# Altium PCB V3_Board.PcbDoc (part 7 of 7)
Units mil, origin at the board's own origin, x right, y up, seen from the top; angles counter-clockwise.
Board outline 6915 x 4422 mil, 2 copper layers (Top Layer, Bottom Layer), stack 57 mil thick; 364 components, 243 nets, 1048 pads, 599 vias.
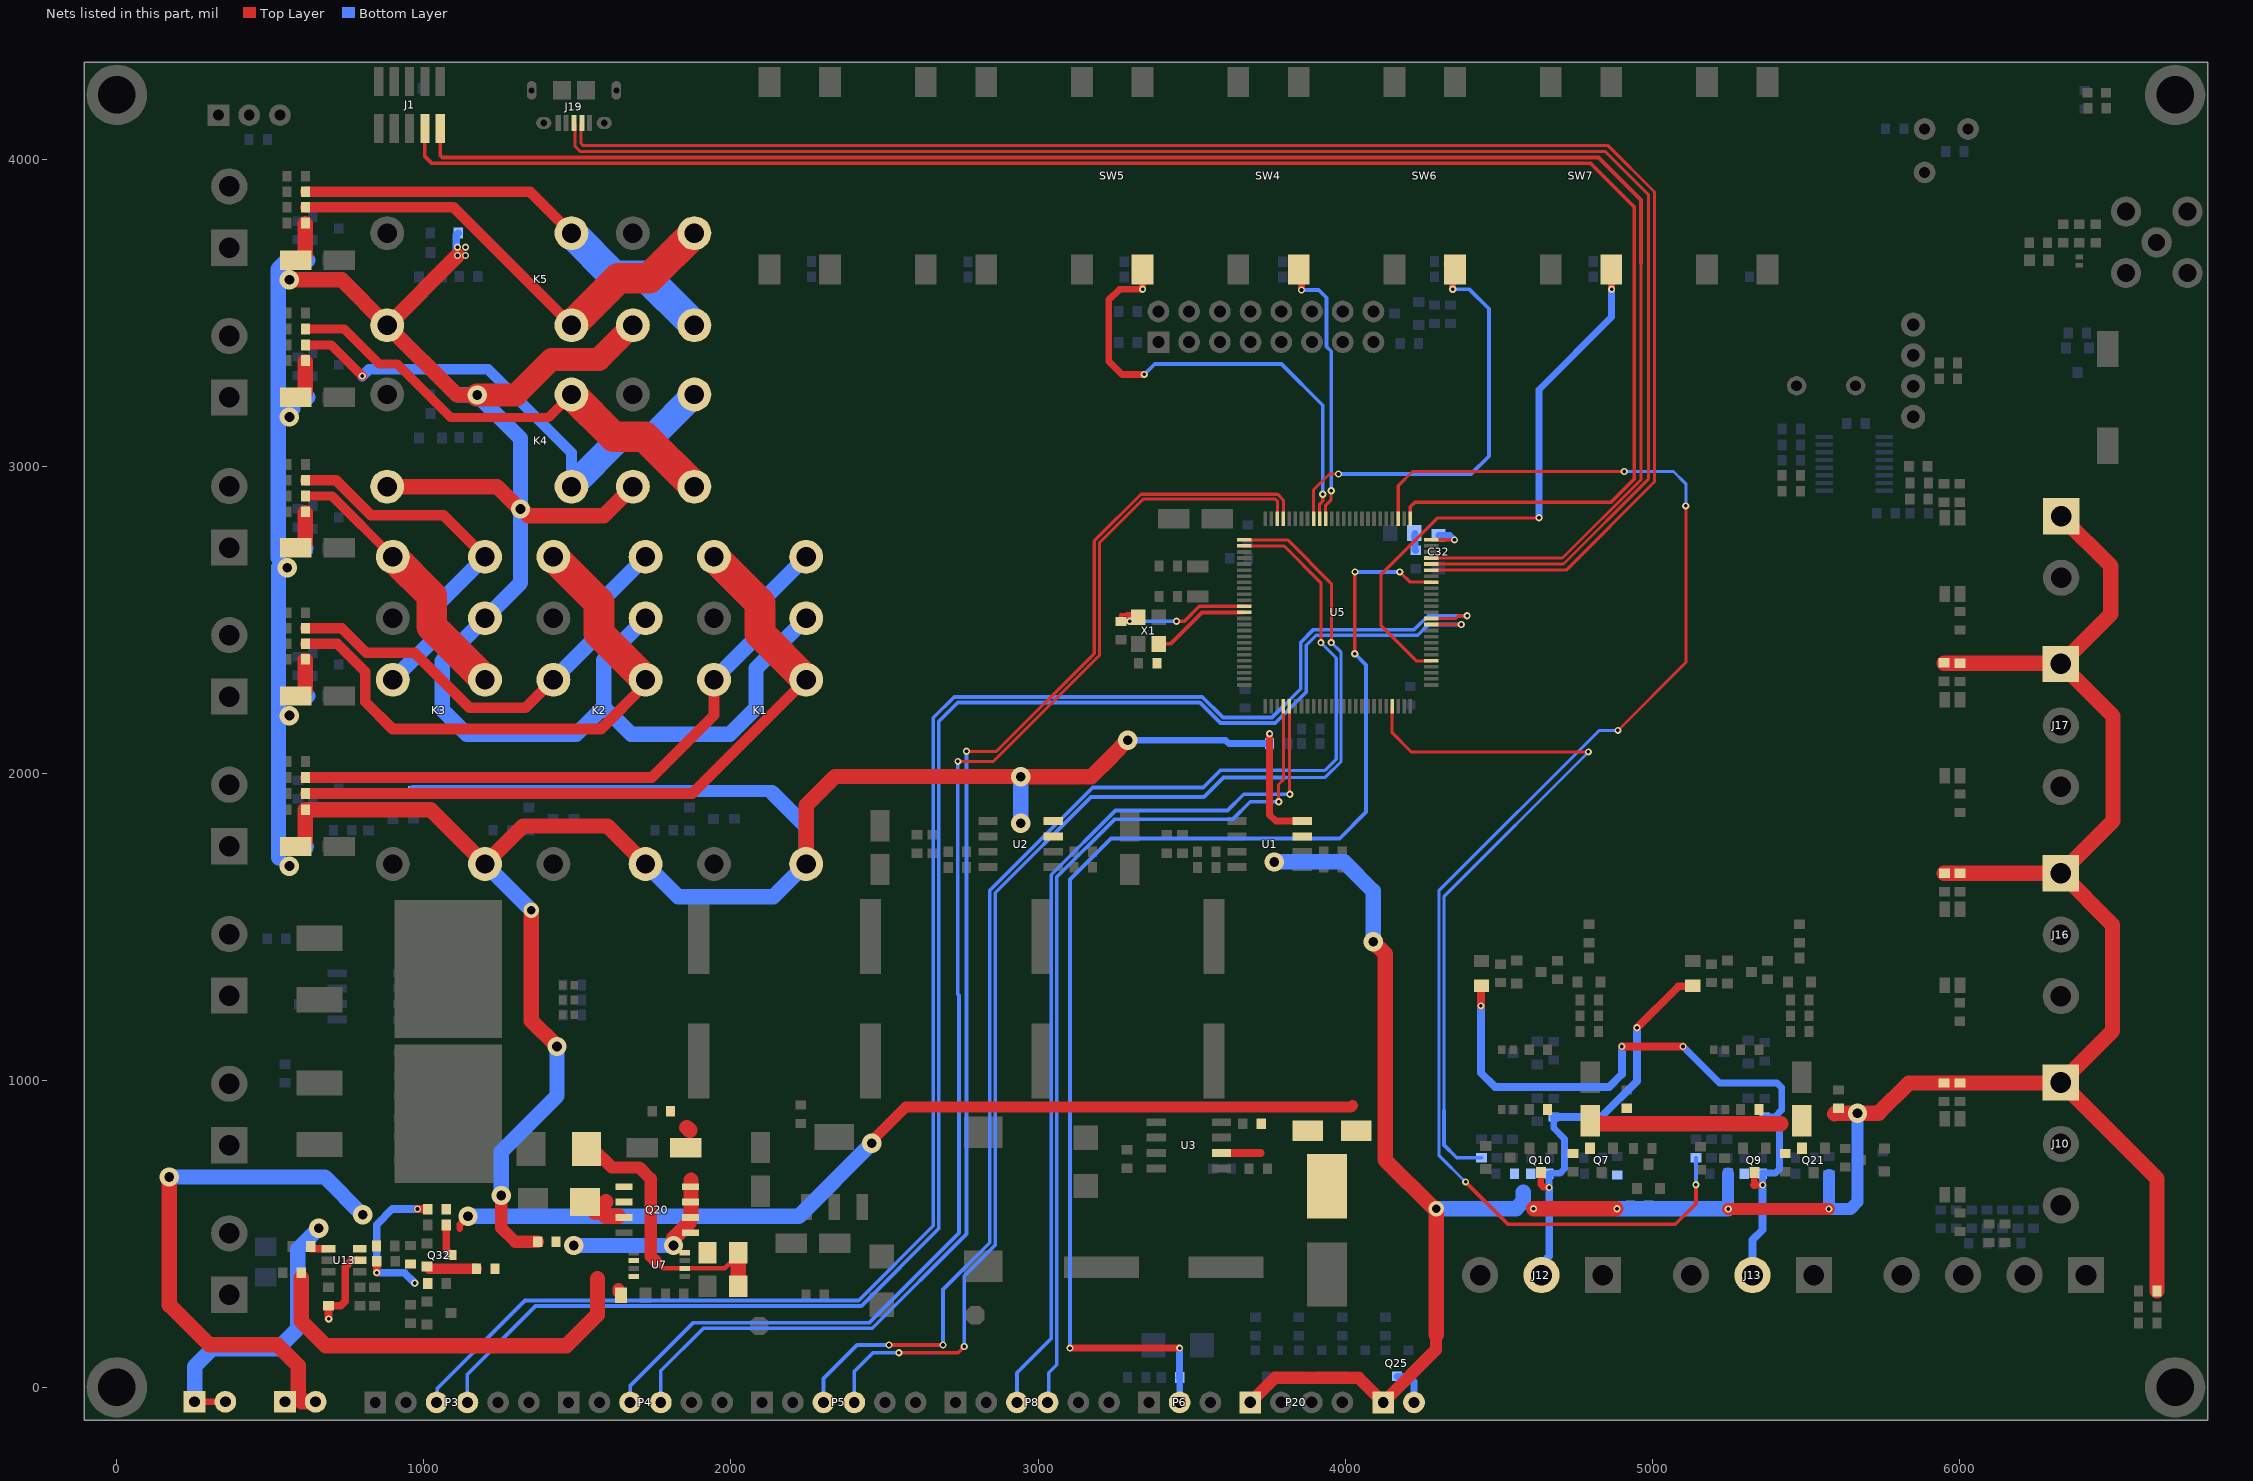
[diagram p4: the nets of this part, all layers, seen from the top]

## Via types
v1: diameter 23.62, hole 11.81, Top Layer to Bottom Layer, 557 vias
v2: diameter 62.99, hole 31.5, Top Layer to Bottom Layer, 31 vias
v3: diameter 50, hole 28, Top Layer to Bottom Layer, 11 vias

## Nets (pads, with @x,y where several pads share a name; then routed paths per layer and width w, separated by ;. In a path a pad name is that pad's centre, name@x,y a point inside that pad or via, vN(x,y) a via of type N, cw(c..) or ccw(c..) an arc to the next point about the centre after c; other vN are vias at no path point) (continued)
SW_3: C39.2 R20.1 SW4.3 U5.90 | length 988.2
  Top Layer w10: U5.90@3936.5,2829.28 3936.5,2873.5 3954.28,2891.28 v1(3954.28,2920.54)
  Top Layer w22: SW4.3@3848.72,3641.04 3858,3631.76 v1(3858,3574)
  Bottom Layer w12: v1(3858,3574) 3914,3574 3939.43,3548.57 3939.43,3389.49 3954.28,3374.64 v1(3954.28,2920.54)
  Bottom Layer w22: R20.1@3856.53,3665.9 3856.53,3617 3857.69,3615.84 3857.69,3574.31 v1(3858,3574)
SW_4: C40.2 R21.1 SW5.3 U5.91 | length 1613.4
  Top Layer w10: U5.91@3916.81,2829.28 U5.91@3916.91,2829.18 ; U5.91@3917,2852 3917,2876.63 3927,2886.63 v1(3927,2909)
  Top Layer w22: SW5.3@3340.38,3640.76 v1(3340.38,3576) 3265,3576 3230,3541 3230,3343 3274,3299 v1(3346,3299)
  Bottom Layer w12: v1(3346,3299) 3380,3333 3793,3333 3927,3199 v1(3927,2909)
  Bottom Layer w22: v1@3340.41,3576.25 C40.2@3340.41,3616 R21.1@3340.41,3665.9
SW_5: C41.2 R22.1 SW6.3 U5.92 | length 1513.9
  Top Layer w10: U5.92@3897.13,2829.28 3897.13,2923.13 3949,2975 v1(3978.09,2975)
  Top Layer w22: v1@4350.28,3575 v1(4350.28,3575.9) SW6.3@4350.28,3640.1
  Top Layer w25: SW6.3@4332.75,3657.62 SW6.3@4348.33,3642.04
  Bottom Layer w12: v1(3978.09,2975) 4410,2975 4468,3033 4468,3513 4405.1,3575.9 v1(4350.28,3575.9)
  Bottom Layer w22: v1(4350.28,3575.9) C41.2@4350.28,3616.69 ; C41.2@4350.59,3617 R22.1@4350.59,3666.9 R22.1@4350.59,3669
SW_7: C57.2 R66.1 SW7.3 U5.55 | length 1991.6
  Top Layer w10: U5.55@4280.99,2366.68 4231.32,2366.68 4116,2482 4116,2647 4301,2832 v1(4631,2832)
  Top Layer w22: SW7.3@4848,3655.49 4867.43,3636.06 v1(4867.43,3575.9)
  Bottom Layer w22: v1(4631,2832) 4631,3249 4867.43,3485.43 v1(4867.43,3575.9) C57.2@4867.43,3616.69 ; C57.2@4867.74,3617 R66.1@4867.74,3666.9 R66.1@4867.74,3669
SWCLK: J1.4 U5.76 | length 5787.4
  Top Layer w12: J1.4@1003.84,4099.75 1003.84,4008.16 1025,3987 4798,3987 4941,3844 4941,2958.58 4865.42,2883 4227,2883 4212.09,2868.09 U5.76@4212.09,2829.28
SWDIO: J1.2 U5.72 | length 5755.1
  Top Layer w10: U5.72@4280.99,2701.32 4707.78,2701.32 4963,2956.54 4963,3661
  Top Layer w12: J1.2@1053.84,4099.75 1053.84,4012.03 1060.87,4005 4825,4005 4963,3867 4963,3661
TDS_1: P3.4 U5.61 | length 5547.6
  Top Layer w10: U5.61@4280.99,2484.79 4281.09,2484.89 4377.89,2484.89 v1(4378,2485)
  Bottom Layer w12: P3.4@1142.14,-47.83 1142.14,44.17 1363.97,266 2424.97,266 2677,518.03 2677,2169 2739,2231 3527,2231 3594,2164 3772,2164 3873,2265 3873,2417 3906.19,2450.19 4236.19,2450.19 4271,2485 v1(4378,2485)
TDS_2: P3.3 U5.62 | length 5673.8
  Top Layer w10: U5.62@4280.99,2504.47 4360.47,2504.47 4369.28,2513.28 v1(4397,2513.28)
  Bottom Layer w12: P3.3@1042.14,-47.83 1044.54,-45.42 1044.54,-1.42 1329.97,284 2415.97,284 2659,527.03 2659,2181 2727,2249 3535,2249 3602,2182 3761.66,2182 3855,2275.34 3855,2426 3897.19,2468.19 4225.19,2468.19 4270.28,2513.28 v1(4397,2513.28)
TDS_3: P4.4 U5.97 | length 4517.3
  Top Layer w10: v1@2765.72,2072 v1(2767,2072) 2865,2072 3183,2390 3183,2757 3335,2909 3780,2909 3798.7,2890.3 U5.97@3798.7,2829.28
  Bottom Layer w12: P4.4@1771.89,-47.83 1771.89,54.89 1911,194 2460.45,194 2767,500.55 v1(2767,2072)
TDS_4: P4.3 U5.98 | length 4537
  Top Layer w10: v1(2739.16,2039) 2854.63,2039 3200,2384.37 3200,2751.37 3341.63,2893 3773.16,2893 3779.02,2887.14 U5.98@3779.02,2829.28
  Bottom Layer w12: P4.3@1671.89,-47.83 1671.89,5.89 1878,212 2451.58,212 2743,503.42 2743,1276.72 2739.16,1280.56 v1(2739.16,2039)
TDS_5: P5.4 U5.1 | length 4250.3
  Top Layer w10: U5.1@3670.75,2760.38 3812.62,2760.38 3955,2618 v1(3955,2426)
  Top Layer w12: v1(2547,114) 2740,114 v1(2760,134)
  Bottom Layer w10: 3805.63,1987 3825,1987 3935,1987 3987,2039 3987,2394 v1(3955,2426)
  Bottom Layer w12: P5.4@2401.64,-47.83 2401.64,52.64 2463,114 v1(2547,114) ; v1(2760,134) 2760,363.44 2861,464.44 2861,1611.27 3172.73,1923 3540,1923 3604,1987 3805.63,1987
TDS_6: P5.3 U5.2 | length 4255.2
  Top Layer w10: U5.2@3670.75,2740.69 3801.31,2740.69 3921,2621 v1(3921,2426)
  Top Layer w12: v1(2515,139) v1(2690.81,139)
  Bottom Layer w10: 3815,2010 3935,2010 3971,2046 3971,2376 v1(3921,2426)
  Bottom Layer w12: P5.3@2301.64,-47.83 2301.64,29.64 2411,139 v1(2515,139) ; v1(2690.81,139) 2690.81,319.71 2843,471.9 2843,1618.72 3178.28,1954 3538,1954 3594,2010 3815,2010
TDS_7: P8.4 U5.29 | length 2867.2
  Top Layer w10: v1@3784,1906 3783.08,1906.92 3783.08,1964.08 3798.7,1979.7 U5.29@3798.7,2219.04
  Bottom Layer w12: P8.4@3031.39,-47.83 3035.14,-44.08 3035.14,48.86 3061,74.72 3061,1662.54 3248.76,1850.3 3633.3,1850.3 3691,1908 v1(3784,1908)
TDS_8: P8.3 U5.30 | length 2941.4
  Top Layer w10: U5.30@3819,2218.43 3819.19,2218.23 3819.19,1927.81 v1@3820,1927
  Bottom Layer w12: P8.3@2931.39,-47.83 2931.39,48.39 3043,160 3043,1670 3252,1879 3617,1879 3670,1932 v1(3820,1932)
TDS_IN.TEMP_SNS: P6.2 R31.1 U5.68 | length 4174.2
  Top Layer w10: v1(4178,2656) 4211.42,2622.58 U5.68@4280.99,2622.58
  Top Layer w12: v1(4031,2390) 4031.5,2390.5 4031.5,2655.5 v1(4032,2656)
  Top Layer w22: v1(3104,129) v1(3461,129)
  Bottom Layer w12: v1(3104,129) 3104,1654.63 3237.37,1788 3982,1788 4068,1874 4068,2353 v1(4031,2390) ; v1(4032,2656) v1(4178,2656)
  Bottom Layer w22: R31.1@3459.14,33.17 3461,35.03 v1(3461,129) ; P6.2@3461.14,-47.83 R31.1@3461.14,31.67
TXIN1: R47.2 U5.47 | length 2365.3
  Top Layer w10: U5.47@4153.03,2219.04 4153.03,2131.92 4214.96,2070 v1(4792,2070)
  Bottom Layer w10: 4322.06,903 4322.06,1600.06 v1(4792,2070)
  Bottom Layer w12: 4322.06,903 4322.06,789.94 4363,749 R47.2@4444,749
TXIN2: R46.2 U5.78 | length 4745.1
  Top Layer w10: U5.78@4172.72,2829.28 4172.72,2936.72 4219,2983 v1(4909,2983) ; v1(4888,2140) 5109,2361 v1(5109,2871)
  Top Layer w12: v1(4392,670) 4530,532 5075,532 5142,599 v1(5142,661)
  Bottom Layer w10: v1(4392,670) 4305.06,756.94 4305.06,1618.06 4827,2140 v1(4888,2140) ; v1(4909,2983) 5069,2983 5109,2943 v1(5109,2871) v1@5109,2868
  Bottom Layer w12: v1(5142,661) R46.2@5142,749
USB_D_N: J19.2 U5.70 | length 5416.9
  Top Layer w10: J19.2@1514.8,4117.7 1512,4114.91 1512,4050.86 1517.86,4045 4855,4045 5007,3893 5007,2949.63 4719.33,2661.95 U5.70@4280.99,2661.95
USB_D_P: J19.3 U5.71 | length 5383.9
  Top Layer w10: J19.3@1489.2,4117.7 1492,4114.91 1492,4042.57 1509.57,4025 4846.72,4025 4987,3884.72 4987,2957.91 4710.73,2681.64 U5.71@4280.99,2681.64
V1_1: K1.2 K1.5 SB10.1 | length 2308
  Top Layer w35: SB10.1@614.84,1934.33 1874.33,1934.33 K1.2@2245,2305
  Top Layer w100: K1.5@1945,2705 2095,2555 2095,2455 K1.2@2245,2305
V1_2: K1.4 K1.7 SB13.1 | length 2054.2
  Top Layer w35: SB13.1@614.84,1986.67 1742.67,1986.67 1945,2189 K1.7@1945,2305
  Bottom Layer w50: K1.7@1945,2305 2108,2468 2108,2568 K1.4@2245,2705
V2_1: K2.2 K2.5 SB14.1 | length 1878.9
  Top Layer w25: K2.2@1722.25,2290.25 K2.2@1722.25,2305
  Top Layer w35: SB14.1@614.84,2422.33 718.67,2422.33 810,2331 810,2233 898,2145 1577,2145 K2.2@1722.25,2290.25
  Top Layer w100: K2.5@1422.25,2705 1571,2556.25 1571,2456.25 K2.2@1722.25,2305
V2_2: K2.4 K2.7 SB22.1 | length 1476.5
  Top Layer w35: SB22.1@614.84,2472.67 733.33,2472.67 813,2393 970,2393 1149,2214 1331.25,2214 K2.7@1422.25,2305
  Bottom Layer w50: K2.7@1422.25,2305 1571,2453.75 1571,2553.75 K2.4@1722.25,2705
V3_1: K3.2 K3.5 SB23.1 | length 891.1
  Top Layer w30: SB23.1@614.84,2903.33 701.17,2903.33 K3.5@899.5,2705
  Top Layer w100: K3.5@899.5,2705 1026,2578.5 1026,2478.5 K3.2@1199.5,2305
V3_2: K3.4 K3.7 SB26.1 | length 1220.1
  Top Layer w25: K3.4@1199.5,2705 K3.4@1205,2710.5
  Top Layer w35: SB26.1@614.84,2954.67 714.33,2954.67 828.5,2840.5 1064,2840.5 K3.4@1199.5,2705
  Bottom Layer w50: K3.7@899.5,2305 1049,2454.5 1049,2554.5 K3.4@1199.5,2705
V4_1: K4.2 K4.5 SB27.1 | length 1664.3
  Top Layer w30: SB27.1@614.84,3395 699,3395 v1(800,3294)
  Bottom Layer w35: v1(800,3294) 822,3316 1209,3316 1481,3044 K4.2@1481,2933.75
  Bottom Layer w85: K4.2@1481,2933.75 1640.25,3093 1740.25,3093 K4.5@1881,3233.75
V4_2: K4.4 K4.7 SB30.1 | length 1540.7
  Top Layer w30: SB30.1@614.84,3447 741,3447 855,3333 914,3333 1088,3159 1406.25,3159 K4.7@1481,3233.75
  Top Layer w100: K4.7@1481,3233.75 1618.75,3096 1718.75,3096 K4.4@1881,2933.75
V5_1: K5.2 K5.5 SB31.1 | length 1549.5
  Top Layer w35: SB31.1@614.84,3843 1097,3843 K5.2@1481,3459
  Top Layer w100: K5.2@1481,3459 1634,3612 1734,3612 K5.5@1881,3759
V5_2: K5.4 K5.7 SB34.1 | length 1446.3
  Top Layer w35: SB34.1@614.84,3894 1346,3894 K5.7@1481,3759
  Bottom Layer w100: K5.7@1481,3759 1620,3620 1720,3620 K5.4@1881,3459
VCC: C24.1 C25.1 C43.1 C45.1 C46.1 C47.1 C58.1 C59.1 C61.1 C62.1 C63.1 C64.1 C65.1 C66.1 C67.1 C68.1 D4.1 D5.1 D8.1 D9.1 D10.1 J10.1 J11.1 J16.1 J17.1 K1.1 K1.3 K2.1 K2.3 K3.1 K3.3 K4.1 K4.3 K5.1 K5.3 P19.1 P20.1 Q7.2 Q21.2 R12.1 R27.2 R36.2 R37.2 R38.2 R39.2 R40.2 R41.2 R50.2 R51.2 R68.2 R77.2 R78.2 SB2.1 SB5.1 SB8.1 SB11.1 SB15.1 SB24.1 SB28.1 SB32.1 SB40.2 U1.3 U1.4 U2.3 U2.4 | length 26242.2
  Top Layer w22: v1(3754,2129) 3754,1865 3774.11,1844.89 U1.4@3860.52,1844.89 ; 4830,877 4835,872
  Top Layer w25: C63.1@583.27,2252.17 595.85,2252.17 614,2270.33 614.84,2271.17 SB15.1@614.84,2372 ; C24.1@583.27,2734.17 595.85,2734.17 614,2752.33 614.84,2753.17 SB24.1@614.84,2852 ; C65.1@583.27,3225.17 595.85,3225.17 614,3243.33 614.84,3244.17 SB28.1@614.84,3344 ; C67.1@583.27,3671.17 595.85,3671.17 614,3689.33 614.84,3690.17 SB32.1@614.84,3792
  Top Layer w39.37: v1(5247,582) v1(5575,582)
  Top Layer w40: C61.1@583.1,1762 C61.1@583.27,1762.17 ; v2(1252,626) 1252,521 1298,475 SB40.2@1371,475 ; P20.1@3691.14,-47.83 3770.97,32 4044.31,32 P19.1@4124.14,-47.83 4296,124.03 4296,172
  Top Layer w50: v2(562.76,3607.3) 732.7,3607.3 K5.1@881,3459 1108,3232 v2(1174,3232) ; C61.1@583.27,1762.17 598.88,1762.17 614,1777.3 614,1877.3 614.84,1878.14 SB11.1@614.84,1882 1022.5,1882 K3.1@1199.5,1705 1323.5,1829 1598.25,1829 K2.1@1722.25,1705 ; C63.1@614,2269.23 614,2270.33 SB15.1@614,2369.23 ; C24.1@614,2749.23 614,2752.33 SB24.1@614,2849.23 ; C65.1@614,3241.23 614,3243.33 SB28.1@614,3341.23 ; C67.1@614,3689.23 614,3689.33 SB32.1@614,3789.23 ; K4.1@881,2933.75 1238.73,2933.75 v2@1311.48,2861 ; K5.1@883,3459 v1(1110,3686) ; v2(1315,2861) 1318.52,2861 1340.52,2839 1586.25,2839 K4.3@1681,2933.75 ; v3(1350,1555) 1350,1195 v2@1431.51,1113.49 ; K1.1@2245,1705 2245,1896 2339,1990 2943.82,1990 v2(2944.18,1989.64) 3174.12,1989.64 3242,2057.52 3242,2058 v2(3292,2108) ; v2@4091,1452 v2(4091.36,1451.64) 4130,1413 4130,742 4289,583 v3(4296,583) 4296,172 ; v1(4613,583) v1@4881.87,583 ; 4835,859 5418,859 ; 5593,891 5596,894 v2(5668,894) 5737,894 5835,992 6328.33,992 J10.1@6330,993.67 ; R38.2@5950,2359 R39.2@6002,2359 6327.33,2359 J17.1@6330,2356.33 ; R36.2@5951,1675 R37.2@6002,1675 J16.1@6330,1675 ; J11.1@6331,2837 6493,2675 6493,2519.33 J17.1@6330,2356.33 ; SB5.1@6643,315 6643,680.67 J10.1@6330,993.67 ; J10.1@6330,993.67 6498,1161.67 6498,1507 J16.1@6330,1675 ; J16.1@6330,1675 6500,1845 6500,2186.33 J17.1@6330,2356.33
  Top Layer w75: v2(1174,3232) 1300,3232 1416,3348 1570,3348 K5.3@1681,3459
  Bottom Layer w22: v2(3292,2108) 3611,2108 3622,2097 R12.1@3754,2097 v1(3754,2129)
  Bottom Layer w25: v1@1106,3704 1106,3752.72 D10.1@1112.28,3759
  Bottom Layer w39.37: v1(5247,582) C46.1@5247,697 ; R68.2@5575,693 v1(5575,582) 5644.94,582 5668,605.06 v2(5668,894)
  Bottom Layer w40: 527,1762.17 C62.1@623.14,1762.17 ; D8.1@967,1943 D5.1@1489,1943 D4.1@2011.63,1943 2134,1943 2221.5,1855.5
  Bottom Layer w50: 526,2702.52 526,3641.88 555.29,3671.17 C68.1@623.14,3671.17 ; 527,1725 527,1762.17 v2@527,2672 ; 547.34,3213.68 v2@574,3187.02 ; 554.83,2252.17 C64.1@623.14,2252.17 ; 557.83,3224.17 C66.1@623.14,3224.17 ; 565.83,2733.17 C25.1@616,2733.17 ; D9.1@1112.28,3233 v2@1172,3233 ; v2(1174,3232) 1315,3091 v2(1315,2861) 1315,2620.5 K3.3@1199.5,2505 1060,2365.5 1060,2208 1140,2128 1497,2128 1586,2217 ; K3.1@1199.5,1705 v3@1349.5,1555 ; v2(1252,626) 1252,768 1434,950 v2(1434,1111) ; K2.1@1722.25,1705 1828.25,1599 2139,1599 K1.1@2245,1705 2245,1827 2134,1938 ; K2.3@1722.25,2505 1586,2368.75 1586,2217 ; K1.3@2245,2505 2082,2342 2082,2213 1997,2128 1675,2128 1586,2217 ; v2(2944.18,1838) v2(2944.18,1989.64) ; v2@3769,1712 3997,1712 4091.36,1617.64 v2(4091.36,1451.64) ; v3(4296,583) 4556.5,583 4579.75,606.25 4579.75,637.34 ; v1@4887,583 v1@5246,583
  other v1: 4885,583 1136,3686 1110,3713 1136,3713
  other v2: 562.76,1698.3 3769.36,1711.64 562.76,2188.3 555.62,2669.3 562.76,3160.3
VCC#5: D11.2 Q32.3 R34.1 SB39.2 | length 3190.4
  Top Layer w22: 1117.5,518.5 1117.5,531.5 v2(1144,558)
  Top Layer w25: R34.1@1073,530 1073,448.37 1083.76,437.61 1083.76,435.64 1086.03,433.37 1088,433.37 Q32.3@1089.37,432
  Top Layer w35: v2(2459,796) 2459,803.57 2569.43,914 4019,914 4024,919
  Bottom Layer w50: v2(1144,558) 2221,558 v2(2459,796)
VCC##5: C9.1 D11.1 R3.2 U3.6 | length 127.4
  Top Layer w25: U3.6@3597.59,764.09 3725,764.09
VCC#M: D6.1 Q20.1 Q20.2 Q20.3 R64.1 SB1.1 U7.2 U7.4 | length 1392
  Top Layer w40: R64.1@1634,311.44 R64.1@1634,321.72
  Top Layer w50: SB1.1@601,359 601,217 681,137 1465,137 1565.87,237.87 1565.87,355 ; D6.1@1558,570.38 D6.1@1560.71,573.09 ; 1584,573.09 1584,596.38 1593.44,605.83 ; 1591.68,557.99 Q20.3@1634,557.99
VCC#P: C1.1 C3.1 C56.2 Q20.5 Q20.6 Q20.7 Q20.8 SB9.1 SB40.1 U7.8 | length 551.5
  Top Layer w50: v2@1813,470 1813,476 1813,486.25 1865.35,538.6 ; 1856.88,847 1865.88,838 ; Q20.6@1870.3,552.38 1870.3,604.38 1870.3,675.9
  Bottom Layer w50: v2(1488,463) v2(1813,463)
VCC_M: C69.1 Q32.2 R11.2 R71.1 R82.1 SB9.2 SB39.1 U13.5 | length 947.6
  Top Layer w25: v1(691,224) 690.14,224.86 R11.2@690.14,266.87 729.36,266.87 744,281.52 744,393 765.88,414.88 U13.5@782.77,414.88 ; v1(847,374.77) C69.1@847,412 C69.1@847,413 ; v1(979.77,582) SB39.1@1014,582 ; Q32.2@1010.63,394.6 Q32.2@1018.23,387
  Top Layer w35: Q32.2@1018.23,387 SB9.2@1172,387
  Bottom Layer w25: v1(971,341) 937.23,374.77 v1(847,374.77) 847,531 898,582 v1(979.77,582)
VDDA: C32.1 C33.1 L1.2 U5.75 | length 191.9
  Top Layer w12: U5.75@4280.99,2760.38 v1@4354.93,2760.38
  Bottom Layer w20: C32.1@4304,2775.35 4340.97,2775.35 v1(4356.14,2760.17)
  Bottom Layer w22: L1.2@4225.88,2773.17 L1.2@4227.96,2771.1 ; L1.2@4227.59,2781.1 4227.59,2727.4 C33.1@4229.66,2725.33
VOUT_A: P27.1 P27.2 R117.2 U13.1 | length 1015
  Top Layer w22: P27.1@254.14,-45.83 P27.2@354.14,-45.83
  Top Layer w25: R117.2@632,453 632.21,452.79 689.75,452.79 U13.1@689.96,452.57
  Bottom Layer w50: P27.1@254.14,-45.83 254.14,69.14 312,127 525,127 590,192 590,451 v2(658,519)
VOUT_B: P28.1 P28.2 R118.2 U13.6 | length 1820.3
  Top Layer w25: P28.1@548.14,-45.83 602.83,-45.83
  Top Layer w50: v2(172,686) 172,269 301,140 523,140 592,71 592,-26.83 602.83,-37.65 602.83,-45.83 P28.2@648.14,-45.83
  Bottom Layer w50: v2(172,686) 678,686 v2(801,563)
VSS: C56.1 D7.1 R65.2 U7.6 | length 945.2
  Top Layer w15: D7.1@1551.47,756.86 1569.62,738.71 1590.83,738.71 ; 1756.31,410.69 1778.69,388.31 U7.6@1849.77,388.31 1980.31,388.31 2000,408 C56.1@2023.58,408
  Top Layer w40: D7.1@1551.47,778.07 1612.54,717 1702,717 1739,680 1739,428 1756.31,410.69
  Top Layer w50: R65.2@2024,330 C56.1@2024,439
W_LED: P19.2 Q25.3 | length 148.1
  Bottom Layer w22: Q25.3@4171.32,34.07 Q25.3@4168.54,36.85 4208.15,36.85 4224.14,20.86 P19.2@4224.14,-47.83 P19.2@4214.79,-38.48
WBUS1: J12.2 Q10.3 R41.1 R90.1 R95.2 | length 1384.2
  Top Layer w22: Q10.3@4642.14,695.6 Q10.3@4637,700.74 4637,661 4645.69,652.31 4663.69,652.31 v1(4664,652)
  Top Layer w25: v1(4950,1172) 5085.48,1307.48 5130.48,1307.48 R95.2@5132,1309
  Bottom Layer w22: v1@4664,657.44 R41.1@4664,697 4665,698 4699,698 4714,713 4714,810 4679,845 R90.1@4679,881.55
  Bottom Layer w25: J12.2@4639.17,366.64 4656.99,384.45 4656.99,420.82 4664,427.84 v1@4664,651.56 ; R90.1@4679,881.55 4833.55,881.55 4950,998 v1(4950,1172)
WBUS2: J13.2 Q9.3 R40.1 R89.1 R96.2 | length 2244.9
  Top Layer w22: J13.2@5326.17,366.64 J13.2@5327.59,368.05 ; Q9.3@5332,700.74 5332,660 ; v1(5359,660) 5332,660 ; 5332,660 5332,657.18 5329.18,660 5332,660
  Top Layer w25: v1(4442,1243) 4442,1307 R96.2@4444,1309 ; v1(4901,1111) v1(5100,1111)
  Bottom Layer w22: v1(5100,1111) 5219,992 5406,992 5421,977 5421,904 5398.5,881.5 ; v1(5359,660) R40.1@5359,697 ; R40.1@5359,699.06 5401.11,699.06 5414,711.94 5414,868.61 5401.11,881.5 5398.5,881.5 ; R89.1@5366,881.55 5366.06,881.5 5398.5,881.5
  Bottom Layer w25: v1(4442,1243) 4442,1025 4488,979 4860,979 4901,1020 v1(4901,1111) ; J13.2@5326.17,366.64 5326.17,481.17 5359,514 v1(5359,660)
XIN: C34.2 U5.12 X1.1 | length 565.7
  Top Layer w12: 3289,2519 3314,2519 3299,2504 v1@3299,2494 ; 3299.33,2507 3289.33,2517 3270,2517 C34.2@3270,2495 v1(3299,2495) 3313.23,2495 X1.1@3326.54,2508.31 ; v1(3451,2495) 3476,2495 3524.84,2543.84 U5.12@3670.75,2543.84
  Bottom Layer w12: v1(3299,2495) v1(3451,2495)
XOUT: C35.2 U5.13 X1.3 | length 319.7
  Top Layer w12: X1.3@3393.46,2421.69 3431.69,2421.69 3534.16,2524.16 U5.13@3670.75,2524.16
pads on no net: J1.6 J1.7 J1.8 J19.4 SW1.2 SW1.4 SW2.2 SW2.4 SW3.2 SW3.4 SW4.2 SW4.4 SW5.2 SW5.4 SW6.2 SW6.4 SW7.2 SW7.4 U5.10 U5.11 U5.19 U5.22 U5.40 U5.46 U5.73 U7.3 U7.7 U10.1 U11.1 U12.1 U16.15

## Polygon pours and split planes (outlines as drawn)
GND on Top Layer "GND_L01_P004" (solid, remove dead copper, pour order 4): 6589,4132 6589,148.06 54.01,147.94 53.99,4132
GND on Bottom Layer "GND_L02_P002" (solid, remove dead copper, pour order 2): 6589,4132 6589,148.06 54.01,147.94 53.99,4132

## Other copper
Top Layer:
  rectangle net GND: 2573,551 3762,686
  rectangle net GND: 2576,608 3535,728
  rectangle net 3V3: 2007,721.97 2415,879.45
  rectangle net 3V3: 2364,640 2456,751
  rectangle net VCC#P: 1783.61,430.63 1962,920
  rectangle net 5V: 2286,335.16 3417.47,526
  rectangle net VCC#5: 3978,780 4097,936
  region net VCC#P: 1520,347 1520,431 1209,431 1209,347
  rectangle net VCC#M: 574,334 629,393
  rectangle net GND: 906,651 1202,717
  rectangle net GND: 1656,750 1771,964
  rectangle net GND: 673,3642 826,3710
  rectangle net VCC: 1087,3664 1159,3729
  rectangle net GND: 658.64,2635.74 778,2775.04
  rectangle net NetQ33_1: 939,247.13 1035,302
  rectangle net GND: 1563,4087 1651,4257
  rectangle net GND: 1330,4191 1651,4257
  rectangle net GND: 1330,4087 1447,4257
  rectangle net VCC##5: 3708,743 3930,881
  rectangle net GND: 3732,658 3817,733
  rectangle net GND: 2008,901 2495,948
  rectangle net VCC#M: 1533,353 1602,548
  rectangle net VCC#M: 1576,353 1655,423
  rectangle net GATE: 1616,432 1704,516
  rectangle net 5V: 3215,1546 3424,1662
  rectangle net CRNT_SNS.IP+_1: 2977,1252 3732,1535
  rectangle net VCC: 3735,1672 3808,1786
  rectangle net GND: 3485,408 3816,686
  rectangle net GND: 1205,935 2411,1072
  rectangle net GND: 1558,942 3731,1180
  rectangle net GND: 905,926 1257,1199.17
  rectangle net GND: 5875,2806 5972,2903
  rectangle net GND: 3165,1828 3329,1936
  rectangle net 5V: 2451,1612 2522,1740
  rectangle net NetJ18_3: 5801,3218 5951,3303
  rectangle net NetJ18_2: 5801,3318 5951,3403
  rectangle net GND: 6266,3574 6322,3695
  rectangle net WBUS2: 5315,647 5378,721
  rectangle net NetQ31_1: 5730,662 5775,722
  rectangle net GND: 5747,301 6076,431
  rectangle net 3V3: 1038,4169 1071,4303
  rectangle net GND: 6266,3574 6598,3662
  rectangle net GND: 658.73,3126.83 781.09,3266.12
  rectangle net NetQ6_1: 580.5,1393.51 792.5,1512.51
  rectangle net NetQ5_1: 580,923 792,1042
  rectangle net GND: 658.73,1664.83 783,1804.12
  rectangle net GND: 658.73,2154.83 779,2294.12
  rectangle net GND: 2860,1888 3329,1936
  rectangle net VCC: 503,1664 639,1802.3
  rectangle net VCC: 526,2153 639,2292.3
  rectangle net VCC: 518.86,2633 638,2773.3
  rectangle net VCC: 524,3125 639,3264.3
  rectangle net VCC: 528,3571 643,3702.3
  rectangle net GND: 3248,2332 3354,2453
  rectangle net 3V3: 4206,2180 4269,2243.16
  region net XIN: 3249,2534 3249,2480 3349.66,2480 3349.66,2534
  rectangle net XOUT: 3371,2339 3420,2447
  rectangle net 3V3: 3532,2806.23 3746,2861
  region net NetLED8_2: 6400.38,4243 6400.38,4148 6440,4148 6440,4243
  rectangle net NetJ9_1: 538,3774.33 576,3865.33
  rectangle net NetJ9_2: 538,3876.33 576,3967.33
  rectangle net NetJ8_1: 538,3326.33 576,3417.33
  rectangle net NetJ8_2: 538,3429.33 576,3520.33
  rectangle net NetJ7_1: 538,2834.33 576,2925.33
  rectangle net NetJ7_2: 538,2937 576,3028
  rectangle net NetJ6_1: 538,2354.33 576,2445.33
  rectangle net NetJ6_2: 538,2455 576,2546
  rectangle net NetQ18_3: 4970,708 5017,798
  rectangle net GND: 4808,1194 4860,1341
  rectangle net LEVEL_IN: 5982,2925 6019,2961
  rectangle net GND: 5930,2558 5972,2903
  rectangle net GND: 5875,2806 5918,2965
  rectangle net CRNT_VOUT.VIOUT2: 2586,1725 2724,1763
  rectangle net CRNT_SNS.IP+_2: 1838,1322 2955,1593
  rectangle net NetJ5_1: 531,1864.33 570,1958.33
  rectangle net NetJ5_2: 525,1969 570,2063
  rectangle net GND: 5493,1194 5537,1347
  rectangle net NetQ31_3: 5606,697 5706,738
  rectangle net NetQ31_3: 5661,697 5706,761
  rectangle net NetQ21_1: 5540,761 5649,806
  rectangle net NetQ11_3: 5212,723 5271,767
  rectangle net NetQ18_1: 4913,571 4967,667
  rectangle net NetQ7_1: 4855,746 4957,799
  rectangle net VCC: 4643,874 4938,927
  rectangle net VCC: 4712,746 4833,925
  rectangle net VCC: 5327,871 5432,931
  rectangle net GND: 4537,948.18 5628,1069
  rectangle net VCC: 5412,857 5628,931
  rectangle net VCC: 5412,748 5522,923
  rectangle net 5V: 3215,1545 3336.4,1740
  rectangle net 5V: 3560.24,1627 3689.24,1713
  rectangle net NetR5_2: 3560,1723 3689,1763
  rectangle net CRNT_VOUT.VIOUT1: 3391,1723 3536,1764
  rectangle net GND: 3165,1775 3686,1862
  rectangle net GND: 2451,1775 2874,1936
  rectangle net VCC: 2902,1779 3094,1878
  rectangle net VCC: 3735,1778 3933,1887
  rectangle net GND: 3969,1668.89 4009.52,1852
  rectangle net VCC#P: 1409,361 1520,504
  rectangle net SHDN: 1790,279.85 1822.64,373
  rectangle net CRNT_SNS.IP+_1: 3827,1668.89 3951,1764
  rectangle net CRNT_SNS.IP+_2: 2899,1668.89 3138,1764
  rectangle net GND: 3488,84 4219,514
  rectangle net GND: 939,4168 1018,4304
  rectangle net NetSB18_1: 5465,2899 5525,2938
  rectangle net SQ: 5791,2925 5854,2966
  rectangle net NetSB17_2: 5787,2979.67 5850,3020.67
  rectangle net VCC##5: 3854,546 4094,764
  rectangle net GND: 2122,247 2266,588
  rectangle net GND: 2007,526 2265,699
  rectangle net VOUT_A: 601,440 712,553
  rectangle net VOUT_B: 768,442 862,598
  rectangle net VCC#5: 1054,414 1181,623
  rectangle net VCC_M: 939,318 1035,419
  rectangle net VCC#M: 1462.88,532.99 1691,678.66
  rectangle net 5V: 2557,192 3417.47,349.92
  rectangle net NetQ14_1: 4671,1299 4776,1348
  rectangle net NetQ13_1: 5358,1299 5460,1346
  rectangle net NetQ10_1: 4652,759 4693,825
  rectangle net NetQ9_1: 5344,759 5388,825
  rectangle net HEATER: 4712,647 4897,726.13
  rectangle net AUX_HEATER: 5402,646 5590,725
  region net NetQ24_1: 4578.63,1363 4578.63,1414 4420,1414 4420,1363
  region net NetQ17_1: 5264.63,1361 5264.63,1414 5106,1414 5106,1361
  rectangle net NetLS1_2: 6398,3001 6550,3193
  rectangle net 5V: 6398,3310 6617,3488
  rectangle net NetJ14_1: 6530,292 6609,447
  rectangle net ANT: 6372,3673 6408,3743
  rectangle net NetJ14_1: 6343,292 6547,446
  rectangle net NetD1_1: 2579,763 3212,885
  rectangle net VCC#M: 1566,405 1703,423
  region net IN+: 667.64,390 667.64,311 711.64,311 711.64,390
  region net IN-: 770,390 770,311 814,311 814,390
  rectangle net IN-: 775,310.7 858,349
  rectangle net VCC_M: 769,399 856,427
  rectangle net BAT: 302,226 558,392
  rectangle net VOUT_A: 215.14,-95.83 392.14,-1.83
  rectangle net VOUT_B: 509.14,-95.83 689.14,-1.83
  rectangle net GND_DRV_1: 284,717 790,869
  rectangle net GND_DRV_2: 281,1196 751.49,1350
  rectangle net SHDN: 1702,272.17 1822,335
  rectangle net NetSB7_1: 1828.89,283.39 1869.24,371.57
  rectangle net "IPK SNS": 3566.09,800.71 3681.25,878
  rectangle net NetC20_2: 3268.52,741.65 3417.47,791
  rectangle net NetD6_2: 1301,533.17 1449.11,859
  rectangle net VSS: 1462.88,696.38 1640.05,859.76
  rectangle net VCC#M: 1533,274.44 1695,369
  region net 5V: 2547.39,631.42 2399.75,631.42 2399.75,441.46 2547.39,441.46
  rectangle net 3V3: 2284,544 2386,799
  rectangle net 5V: 2287,282.01 2433,350.91
  region net GND: -106,-56.15 -106,74.02 cw(c-100.99,74.03) -103.24,78.5 cw(c-98.85,76.31) -102.78,79.25 cw(c3.01,0.18) 135.09,0.18 cw(c3.01,0.18) 82.93,-104.98 cw(c79.9,-100.99) 79.9,-106 -106,-106
  region net GND: 6809,-56.15 6809,74.02 ccw(c6803.99,74.03) 6806.24,78.5 ccw(c6801.85,76.31) 6805.78,79.25 ccw(c6699.99,0.18) 6567.91,0.18 ccw(c6699.99,0.18) 6620.07,-104.98 ccw(c6623.1,-100.99) 6623.1,-106 6809,-106
  region net GND: 6809,4266.15 6809,4135.98 cw(c6803.99,4135.97) 6806.24,4131.5 cw(c6801.85,4133.69) 6805.78,4130.75 cw(c6699.99,4209.82) 6567.91,4209.82 cw(c6699.99,4209.82) 6620.07,4314.98 cw(c6623.1,4310.99) 6623.1,4316 6809,4316
  region net GND: -106.04,4266.22 -106.04,4136.04 ccw(c-101.03,4136.04) -103.28,4131.56 ccw(c-98.89,4133.76) -102.81,4130.81 ccw(c2.98,4209.89) 135.06,4209.89 ccw(c2.98,4209.89) 82.9,4315.04 ccw(c79.86,4311.06) 79.86,4316.06 -106.04,4316.06
  pour cut-out: 792,1615 792,2764 2344,2764 2344,1615
  pour cut-out: 780,3859 1948,3859 1948,2829 780,2829
  pour cut-out: 2570.01,881.19 2570.01,310.32 3071,310.32 3071,312.29 3071,314.26 3071,884.14 3070.01,884.14 2570.01,884.14
Bottom Layer:
  rectangle net GND: 3641,996 3726,1179
  rectangle net 5V: 3152,203 3332,288
  rectangle net 5V: 3152,427 3332,512
  rectangle net GND: 2896,991 2973,1189
  rectangle net VCC: 3255,2074 3777,2145
  rectangle net 3V3: 1028,4170 1081,4259
  rectangle net GND: 667,1659.57 769.67,1782
  region net GND: 797,2178 720,2255 660,2195 737,2118
  region net GND: 793,2652 714.5,2730.5 657,2673 735.5,2594.5
  rectangle net GND: 781,3648 827,3713
  region net GND: 839.5,3107.5 720,3227 660,3167 779.5,3047.5
  rectangle net VCC: 1090.55,3673 1154,3788
  rectangle net GND: 5845,3909 5973,4046
  rectangle net 3V3: 5990,4002 6070,4135
  rectangle net NetR116_1: 5799,4060 5922,4134
  rectangle net GND: 293,429 525,575
  rectangle net 3V3: 5883,2959 6022,3029
  rectangle net IND3: 4489,1046 4564,1109
  rectangle net GND: 5946,302 6075,431
  rectangle net GND: 3649,3431 3829,3638
  rectangle net GND: 3303,3368 3433,3447
  rectangle net 5V: 3303,3468 3433,3547
  rectangle net GND: 3554,3367 3829,3442
  rectangle net NetP13_15: 4055,3366 4194,3450
  rectangle net PWM_BCK: 4055,3466 4186,3550
  rectangle net GND: 4220,3441 4309,3480
  rectangle net NetQ2_1: 4220,3510 4365,3551
  rectangle net GND: 3664,2679 3707,2767
  rectangle net RO1: 5615,3224 5778,3308
  rectangle net VCC: 4868,564 4924,711
  region net GND: 6379,541.67 6218.17,541.67 6218.17,471.83 6379,471.83
  rectangle net GND: 5444.5,646.5 5487.5,768.5
  region net GND: 5964,489.17 5964,304 6053,304 6053,489.17
  region net GND: 6015.5,541.67 5964.5,541.67 5964.5,450 6015.5,450
  region net NetR112_2: 5916.33,603 5916.33,560 6061,560 6061,603
  region net GND: 6183.33,492 6183.33,439.17 6379,439.17 6379,492
  region net NetC79_2: 6111.17,517.67 6060.17,517.67 6060.17,447.83 6111.17,447.83
  rectangle net NetC79_2: 6022,498 6111.17,542
  rectangle net NetC42_1: 6119,449 6170,518.83
  rectangle net NetC42_1: 6119,498 6211,542
  rectangle net 4-20mA: 6173,564 6260,648
  rectangle net GND: 568,3782 685,3832
  rectangle net GND: 568,3339.47 685,3389.47
  rectangle net GND: 568,2845.46 685,2895.46
  rectangle net VCC: 501,3572 647,3696.05
  rectangle net VCC: 501,3125 647,3249.05
  rectangle net VCC: 500,2634 641.86,2758.05
  rectangle net VCC: 501,2153 647,2277.05
  rectangle net VCC: 501,1663 647,1787.05
  rectangle net VDDA: 4202,2751 4331,2810
  region net 3V3: 4271,2182 4271,2241.1 4189.66,2241.1 4189.66,2182
  rectangle net NetD10_2: 1000,3673 1052,3788
  rectangle net IND4: 5186,1073 5260,1136
  rectangle net GND: 4476,675.5 4515,770.5
  rectangle net GND: 5404,2996 5441,3142
  rectangle net GND: 5275,787 5330,890
  rectangle net GND: 4756.5,672 4799.5,768.5
  region net VCC: 4628,557 4628,717.69 4531.5,717.69 4531.5,557
  rectangle net VCC: 5223.5,675 5320,720
  rectangle net GND: 5172,679 5211,770.5
  rectangle net GND: 568,1961.46 661,2011.46
  rectangle net FILL_CNTRL: 568,1898.51 661,1948.51
  rectangle net GND: 568,2363.69 696,2413.69
  rectangle net FLUSH_CNTRL: 568,2300.74 661,2350.74
  rectangle net MEM_CNTRL: 571.16,2779.1 664.16,2829.1
  rectangle net PM_CNTRL: 568,3276.51 661,3326.51
  rectangle net RS_CNTRL: 567,3717 685,3769.05
  rectangle net RO2: 5426,3215 5516,3304
  rectangle net RO1: 5660.68,3116 5778,3308
  rectangle net 3V3: 5778.5,2774 6078,2816
  region net NetQ11_3: 5320,727.5 5320,770.5 5223.5,770.5 5223.5,727.5
  region net NetQ12_3: 4622,727.5 4622,770.5 4525.5,770.5 4525.5,727.5
  rectangle net AUX_HEATER: 5504.67,647.55 5547.67,769.55
  rectangle net HEATER: 4809,646 4860,768
  rectangle net NetQ29_1: 4605,1110.55 4699,1154.55
  rectangle net NetQ30_1: 5292,1108 5386,1152
  rectangle net NetQ19_1: 6330.86,3351.86 6373.18,3457.16
  rectangle net BAT: 291,225 524,396.17
  rectangle net 3V3: 3324.14,-14.83 3423.14,177.17
  region net GND: -106,-56.15 -106,74.02 cw(c-100.99,74.03) -103.24,78.5 cw(c-98.82,76.29) -102.78,79.25 cw(c3.01,0.18) 135.09,0.18 cw(c3.01,0.18) 82.93,-104.98 cw(c79.9,-100.99) 79.9,-106 -106,-106
  region net GND: 6809,-56.15 6809,74.02 ccw(c6803.99,74.03) 6806.24,78.5 ccw(c6801.82,76.29) 6805.78,79.25 ccw(c6699.99,0.18) 6567.91,0.18 ccw(c6699.99,0.18) 6620.07,-104.98 ccw(c6623.1,-100.99) 6623.1,-106 6809,-106
  region net GND: 6809,4266.15 6809,4135.98 cw(c6803.99,4135.97) 6806.24,4131.5 cw(c6801.82,4133.71) 6805.78,4130.75 cw(c6699.99,4209.82) 6567.91,4209.82 cw(c6699.99,4209.82) 6620.07,4314.98 cw(c6623.1,4310.99) 6623.1,4316 6809,4316
  region net GND: -106.04,4266.21 -106.04,4136.04 ccw(c-101.03,4136.04) -103.28,4131.56 ccw(c-98.86,4133.77) -102.81,4130.81 ccw(c2.98,4209.89) 135.06,4209.89 ccw(c2.98,4209.89) 82.9,4315.04 ccw(c79.86,4311.05) 79.86,4316.06 -106.04,4316.06
  pour cut-out: 780,3859 1948,3859 1948,2829 780,2829
  pour cut-out: 792,1615 792,2764 2344,2764 2344,1615
  pour cut-out: 2570.01,881.19 2570.01,310.32 3071,310.32 3071,312.29 3071,314.26 3071,884.14 3070.01,884.14 2570.01,884.14

## Silkscreen, mask and mechanical layers (free items; w line width, h text height)
Top Overlay:
  text "PHOTO TRANSISTOR" at 6329,4239 h35
  text "MOTION DETETCTION" at 5775,4210 h55
  text "BOOT0 SWITCH" at 278,4198.07 h65
  text "RESIN SAVER" at -100.54,4044.17 h65 r270
  text "SOFTWARE PROG." at 776,4002 h40
  text "-ve" at 497.14,3841 h80 r90
  text "+ve" at 502.14,3641 h80 r90
  text "PROP MIXING" at -100.54,3557.17 h75 r270
  text "-ve" at 497.14,3354 h80 r90
  text "LCD DISPLAY" at 3327,3275 h85
  text "+ve" at 502.14,3154 h80 r90
  text "FS10000A  / RX MODULE" at 5469,3105 h55 r90
  text "MEM SAVER" at -100.54,3068.17 h75 r270
  text "BUZZER" at 6804.25,3017 h55 r90
  text "*" at 5912.7,2967.43 h75 r270
  text "-ve" at 497.14,2865 h80 r90
  text "+ve" at 6249.64,2761.83 h80 r90
  text "+ve" at 502.14,2665 h80 r90
  text "AUTO FLUSH" at -100.54,2583.17 h75 r270
  text "-ve" at 6249.64,2557.83 h80 r90
  text "LEVEL SENSOR" at 6804.72,2504 h65 r90
  text "-ve" at 497.14,2380 h80 r90
  text "+ve" at 6248.64,2277.16 h80 r90
  text "+ve" at 502.14,2180 h80 r90
  text "AUTO FILL" at -100.54,2096.17 h85 r270
  text "DATA" at 6247.64,2054.16 h80 r90
  text "-ve" at 497.14,1893 h80 r90
  text "-ve" at 6248.64,1877.16 h80 r90
  text "FLOW METER-3" at 6804.72,1828.67 h85 r90
  text "*" at 4014.54,1782.61 h75 r180
  text "*" at 3080.22,1769.33 h75 r270
  text "*" at 3603.96,1731.19 h75 r180
  text "+ve" at 502.14,1693 h80 r90
  text "*" at 2683.09,1656.59 h75
  text "PUMP-2" at -100.54,1609.67 h85 r270
  text "+ve" at 6248.64,1595.83 h80 r90
  text "+ve" at 502.14,1406.5 h80 r90
  text "DATA" at 6247.64,1372.83 h80 r90
  text "-ve" at 497.14,1206.5 h80 r90
  text "-ve" at 6248.64,1195.83 h80 r90
  text "#" at 5536.59,1147 h55 r270
  text "#" at 4851.04,1146 h55 r270
  text "FLOW METER-2" at 6804.72,1146.33 h85 r90
  text "PUMP-1" at -100.54,1122.61 h85 r270
  text "*" at 2190.21,944.71 h75 r270
  text "+ve" at 502.14,919.07 h80 r90
  text "+ve" at 6248.64,914.49 h80 r90
  text "-ve" at 497.14,719.07 h80 r90
  text "DATA" at 6247.64,691.49 h80 r90
  text "BATTERY" at -99.96,634.61 h85 r270
  text "-ve" at 6248.64,514.49 h80 r90
  text "FLOW METER-1" at 6804.72,465 h85 r90
  text "DATA" at 4537,449 h80
  text "DATA" at 5224,449 h80
  text "-ve" at 4360,448 h80
  text "+ve" at 4760,448 h80
  text "-ve" at 5047,448 h80
  text "+ve" at 5447,448 h80
  text "-ve" at 5732.83,448 h80
  text "-ve" at 498.14,437.17 h80 r90
  text "+ve" at 6543,380 h80
  text "#" at 943,376.41 h55 r180
  text "*" at 922,336.09 h75
  text "*" at 2219.93,265.36 h75
  text "+ve" at 502.14,228.17 h80 r90
  text "5V" at 2834,205 h80
  text "3V3" at 2133,171 h80
  text "1" at 816,17 h35
  text "6" at 1352.14,17 h35
  text "1" at 1445.75,17 h35
  text "6" at 1981.89,17 h35
  text "1" at 2075.5,17 h35
  text "6" at 2611.64,17 h35
  text "1" at 2705.25,17 h35
  text "6" at 3241.39,17 h35
  text "VOUT-A" at 199.14,9.17 h60
  text "VOUT-B" at 493.14,9.17 h60
  text "TDS-1" at 839,4.79 h85
  text "TDS-2" at 1468.75,4.79 h85
  text "TDS-3" at 2098.5,4.79 h85
  text "TDS-4" at 2728.25,4.79 h85
  text "DS18B20" at 3309.14,4.79 h75
  text "RGB LED" at 3639.14,4.79 h85
  text "W-LED" at 4056.14,4.79 h75
  text "MAIN-HEATER" at 4306,-100.84 h85
  text "AUX-HEATER" at 4994,-100.84 h85
  text "PRESSURE SENSOR" at 5680,-100.84 h85
Bottom Overlay:
  drawing of 3019 lines, arcs and shapes, not listed
  text "*" at 1078.43,4192.7 h75
  text "Note:" at 217.14,4013.05 h75
  text "*" at 6040.43,3987.7 h75
  text "* >> 0.1uF" at 217.14,3955.17 h70
  text "# >> 10K" at 222.14,3891.35 h70
  text "#" at 604.86,3824.59 h55
  text "*" at 707.14,3634.26 h75
  text "*" at 2347.37,3579.7 h75
  text "*" at 2856.73,3579.75 h75
  text "*" at 4375.02,3579.7 h75
  text "*" at 5400.43,3579.7 h75
  text "*" at 3364.85,3578.7 h75
  text "*" at 3882.12,3578.54 h75
  text "*" at 4894.35,3577.24 h75
  text "#" at 604,3381.59 h55
  text "*" at 706.14,3186.26 h75
  text "*" at 5397.57,3056.63 h75 r180
  text "#" at 5924.59,3011 h55 r270
  text "#" at 5395.41,2956.33 h55 r90
  text "#" at 603.86,2889.76 h55
  text "*" at 3719.84,2832.98 h75 r90
  text "#" at 5744.26,2821.14 h55 r180
  text "*" at 707.14,2696.26 h75
  text "*" at 3708.89,2663.5 h75
  text "*" at 4194.86,2640.89 h75 r270
  text "#" at 602.86,2406.76 h55
  text "*" at 3711.3,2297.43 h75 r90
  text "*" at 707,2215.09 h75
  text "*" at 4174.93,2198.57 h75 r270
  text "#" at 3725.66,2084.75 h55 r90
  text "*" at 3942.43,2058.45 h75
  text "#" at 603.86,2005.76 h55
  text "*" at 706,1726.09 h75
  text "ZERO CARBON FOOTPRINT" at 3900.77,1531.7 h38
  text "*" at 568.71,1285.47 h75 r180
  text "*" at 4531.8,835.43 h75 r90
  text "*" at 5229.8,833.43 h75 r90
  text "*" at 4753.57,786.3 h75 r180
  text "*" at 5441.57,786.3 h75 r180
  text "#" at 5561.5,780.09 h55
  text "#" at 4872,779.59 h55
  text "*" at 4466.57,734.3 h75 r180
  text "*" at 5162.57,734.3 h75 r180
  text "#" at 6173,602.59 h55
  text "#" at 6022,600.59 h55
  text "#" at 3695.14,256.76 h55
  text "#" at 3835.14,256.76 h55
  text "#" at 3978.14,256.76 h55
  text "#" at 4118.14,256.76 h55
  text "*" at 3246.14,-4.74 h75
Draft and Dimension:
  lines w10: 5199,2303 5209,2293 5779,2293 5789,2303 5789,3503.5 5779,3513.5 5209,3513.5 5199,3503.5 5199,2303
Board Outline:
  the board outline again, w10
Fab:
  drawing of 319 lines, arcs and shapes, not listed
  text "Layer" at 7459.5,4429.97 h60
  text "Name" at 7869.41,4429.97 h60
  text "Material" at 8799.16,4429.97 h60
  text "Thickness" at 9658.92,4429.97 h60
  text "Constant" at 10308.76,4429.97 h60
  text "Board Layer Stack" at 10878.62,4429.97 h60
  text "Top Overlay" at 7869.41,4309.97 h60
  text "Top Solder" at 7869.41,4189.97 h60
  text "Solder Resist" at 8799.16,4189.97 h60
  text "3.00mil" at 9658.92,4189.97 h60
  text "3.5" at 10308.76,4189.97 h60
  text "1" at 7459.5,4069.97 h60
  text "Top Layer" at 7869.41,4069.97 h60
  text "10.00mil" at 9658.92,4069.97 h60
  text "Dielectric 1" at 7869.41,3949.97 h60
  text "FR-4" at 8799.16,3949.97 h60
  text "37.00mil" at 9658.92,3949.97 h60
  text "4.8" at 10308.76,3949.97 h60
  text "2" at 7459.5,3829.97 h60
  text "Bottom Layer" at 7869.41,3829.97 h60
  text "10.00mil" at 9658.92,3829.97 h60
  text "Bottom Solder" at 7869.41,3709.97 h60
  text "Solder Resist" at 8799.16,3709.97 h60
  text "3.00mil" at 9658.92,3709.97 h60
  text "3.5" at 10308.76,3709.97 h60
  text "Bottom Overlay" at 7869.41,3589.97 h60
  text "Note:" at -100,-283.99 h55
  text "J18 is the header placed for FS10000A Receiver Module and it should be mounted on board with an offset of atleast 3mm from the surface of PCB." at -117,-489.64 h55
Drill Drawing:
  drawing of 157 lines, arcs and shapes, not listed
  text "Symbol" at -75.5,7109.94 h72
  text "Count" at 430.38,7109.94 h72
  text "Hole Size" at 1030.22,7109.94 h72
  text "Plated" at 2169.88,7109.94 h72
  text "Hole Type" at 2675.76,7109.94 h72
  text "Drill Layer Pair" at 3409.56,7109.94 h72
  text "Via/Pad" at 4909.11,7109.94 h72
  text "Pad Shape" at 5498.96,7109.94 h72
  text "Template" at 6244.76,7109.94 h72
  text "Description" at 7384.43,7109.94 h72
  text "Hole Tolerance (+)" at 8238.19,7109.94 h72
  text "Hole Tolerance (-)" at 9571.8,7109.94 h72
  text "1" at 430.38,6959.94 h60
  text "55.12mil (1.400mm)" at 1030.22,6959.94 h60
  text "PTH" at 2169.88,6959.94 h60
  text "Round" at 2675.76,6959.94 h60
  text "Top Layer - Bottom Layer" at 3409.56,6959.94 h60
  text "Pad" at 4909.11,6959.94 h60
  text "Rounded" at 5498.96,6959.94 h60
  text "c250h140" at 6244.76,6959.94 h60
  text "2" at 430.38,6809.94 h60
  text "19.69mil (0.500mm)" at 1030.22,6809.94 h60
  text "PTH" at 2169.88,6809.94 h60
  text "Slot" at 2675.76,6809.94 h60
  text "Top Layer - Bottom Layer" at 3409.56,6809.94 h60
  text "Pad" at 4909.11,6809.94 h60
  text "Rounded" at 5498.96,6809.94 h60
  text "r80_155h50_115r100" at 6244.76,6809.94 h60
  text "2" at 430.38,6659.94 h60
  text "21.65mil (0.550mm)" at 1030.22,6659.94 h60
  text "PTH" at 2169.88,6659.94 h60
  text "Slot" at 2675.76,6659.94 h60
  text "Top Layer - Bottom Layer" at 3409.56,6659.94 h60
  text "Pad" at 4909.11,6659.94 h60
  text "Rounded" at 5498.96,6659.94 h60
  text "r100_125h55_85r100" at 6244.76,6659.94 h60
  text "4" at 430.38,6509.94 h60
  text "37.40mil (0.950mm)" at 1030.22,6509.94 h60
  text "PTH" at 2169.88,6509.94 h60
  text "Round" at 2675.76,6509.94 h60
  text "Top Layer - Bottom Layer" at 3409.56,6509.94 h60
  text "Pad" at 4909.11,6509.94 h60
  text "(Mixed)" at 5498.96,6509.94 h60
  text "(Mixed)" at 6244.76,6509.94 h60
  text "4" at 430.38,6359.94 h60
  text "40.16mil (1.020mm)" at 1030.22,6359.94 h60
  text "PTH" at 2169.88,6359.94 h60
  text "Round" at 2675.76,6359.94 h60
  text "Top Layer - Bottom Layer" at 3409.56,6359.94 h60
  text "Pad" at 4909.11,6359.94 h60
  text "Rounded" at 5498.96,6359.94 h60
  text "c200h102" at 6244.76,6359.94 h60
  text "4" at 430.38,6209.94 h60
  text "59.06mil (1.500mm)" at 1030.22,6209.94 h60
  text "PTH" at 2169.88,6209.94 h60
  text "Round" at 2675.76,6209.94 h60
  text "Top Layer - Bottom Layer" at 3409.56,6209.94 h60
  text "Pad" at 4909.11,6209.94 h60
  text "Rounded" at 5498.96,6209.94 h60
  text "c250h150" at 6244.76,6209.94 h60
  text "4" at 430.38,6059.94 h60
  text "122.05mil (3.100mm)" at 1030.22,6059.94 h60
  text "PTH" at 2169.88,6059.94 h60
  text "Round" at 2675.76,6059.94 h60
  text "Top Layer - Bottom Layer" at 3409.56,6059.94 h60
  text "Pad" at 4909.11,6059.94 h60
  text "Rounded" at 5498.96,6059.94 h60
  text "c500h310" at 6244.76,6059.94 h60
  text "11" at 430.38,5909.94 h60
  text "28.00mil (0.711mm)" at 1030.22,5909.94 h60
  text "PTH" at 2169.88,5909.94 h60
  text "Round" at 2675.76,5909.94 h60
  text "Top Layer - Bottom Layer" at 3409.56,5909.94 h60
  text "Via" at 4909.11,5909.94 h60
  text "Rounded" at 5498.96,5909.94 h60
  text "v127h71" at 6244.76,5909.94 h60
  text "16" at 430.38,5759.94 h60
  text "39.37mil (1.000mm)" at 1030.22,5759.94 h60
  text "PTH" at 2169.88,5759.94 h60
  text "Round" at 2675.76,5759.94 h60
  text "Top Layer - Bottom Layer" at 3409.56,5759.94 h60
  text "Pad" at 4909.11,5759.94 h60
  text "(Mixed)" at 5498.96,5759.94 h60
  text "(Mixed)" at 6244.76,5759.94 h60
  text "31" at 430.38,5609.94 h60
  text "31.50mil (0.800mm)" at 1030.22,5609.94 h60
  text "PTH" at 2169.88,5609.94 h60
  text "Round" at 2675.76,5609.94 h60
  text "Top Layer - Bottom Layer" at 3409.56,5609.94 h60
  text "Via" at 4909.11,5609.94 h60
  text "Rounded" at 5498.96,5609.94 h60
  text "v160h80" at 6244.76,5609.94 h60
  text "37" at 430.38,5459.94 h60
  text "66.93mil (1.700mm)" at 1030.22,5459.94 h60
  text "PTH" at 2169.88,5459.94 h60
  text "Round" at 2675.76,5459.94 h60
  text "Top Layer - Bottom Layer" at 3409.56,5459.94 h60
  text "Pad" at 4909.11,5459.94 h60
  text "(Mixed)" at 5498.96,5459.94 h60
  text "(Mixed)" at 6244.76,5459.94 h60
  text "40" at 430.38,5309.94 h60
  text "62.99mil (1.600mm)" at 1030.22,5309.94 h60
  text "PTH" at 2169.88,5309.94 h60
  text "Round" at 2675.76,5309.94 h60
  text "Top Layer - Bottom Layer" at 3409.56,5309.94 h60
  text "Pad" at 4909.11,5309.94 h60
  text "Rounded" at 5498.96,5309.94 h60
  text "c280h160" at 6244.76,5309.94 h60
  text "41" at 430.38,5159.94 h60
  text "35.43mil (0.900mm)" at 1030.22,5159.94 h60
  text "PTH" at 2169.88,5159.94 h60
  text "Round" at 2675.76,5159.94 h60
  text "Top Layer - Bottom Layer" at 3409.56,5159.94 h60
  text "Pad" at 4909.11,5159.94 h60
  text "(Mixed)" at 5498.96,5159.94 h60
  text "(Mixed)" at 6244.76,5159.94 h60
  text "557" at 430.38,5009.94 h60
  text "11.81mil (0.300mm)" at 1030.22,5009.94 h60
  text "PTH" at 2169.88,5009.94 h60
  text "Round" at 2675.76,5009.94 h60
  text "Top Layer - Bottom Layer" at 3409.56,5009.94 h60
  text "Via" at 4909.11,5009.94 h60
  text "Rounded" at 5498.96,5009.94 h60
  text "v60h30" at 6244.76,5009.94 h60
  text "754 Total" at 430.38,4859.94 h60
  text "Slot definitions :" at -75.5,4714.97 h60
  text "Routed Path Length" at 957.19,4714.97 h60
  text "= Calculated from tool start centre position to tool end centre position." at 2059.86,4714.97 h60
  text "Hole Length" at 957.19,4614.99 h60
  text "= Routed Path Length + Tool Size = Slot length as defined in the PCB layout" at 1649.99,4614.99 h60

## Dimensions
5199,2303 to 5789,2303 on Draft and Dimension
5209,2293 to 5209,3513.5 on Draft and Dimension
6809.14,4316.06 to -105.86,4316.06 on Draft and Dimension
-105.86,4316.06 to -105.86,-105.83 on Draft and Dimension

## Text inside footprints (layer, text, board x,y; h text height)
J19: Top Overlay "Board Edge" at 1582.63,4293.74 h19.68 r180